# Altium PCB PCB2.PcbDoc
Units mm, origin at the board's own origin, x right, y up, seen from the top; angles counter-clockwise.
Board outline 150 x 150 mm, 2 copper layers (Top Layer, Bottom Layer); 52 components, 46 nets, 256 pads, 0 vias.
Unrouted connection lines stored in the file: 167.
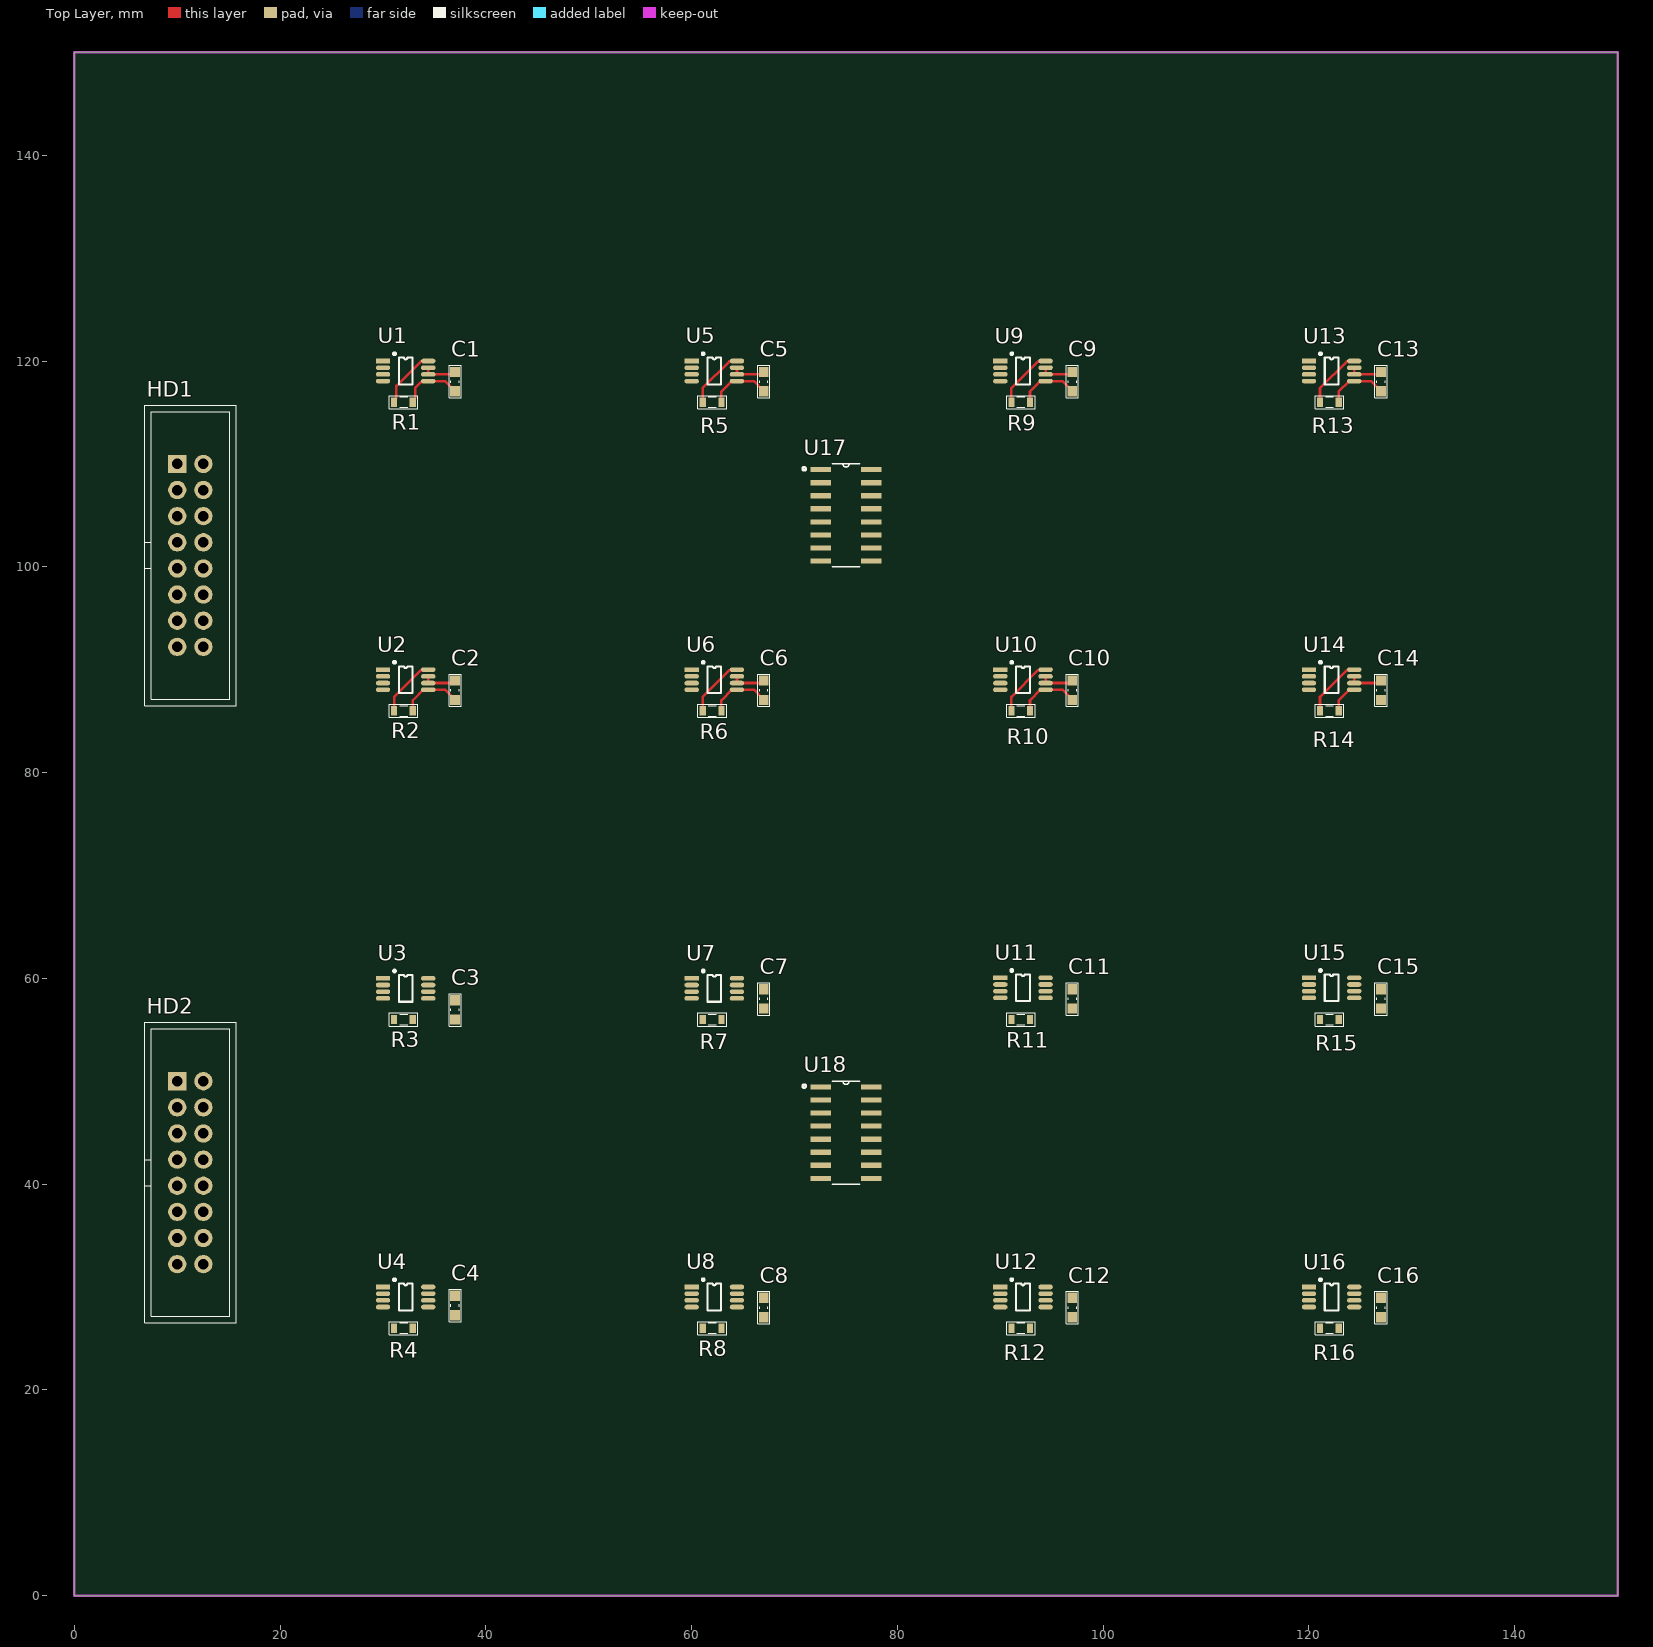
[diagram p0: Top Layer view]
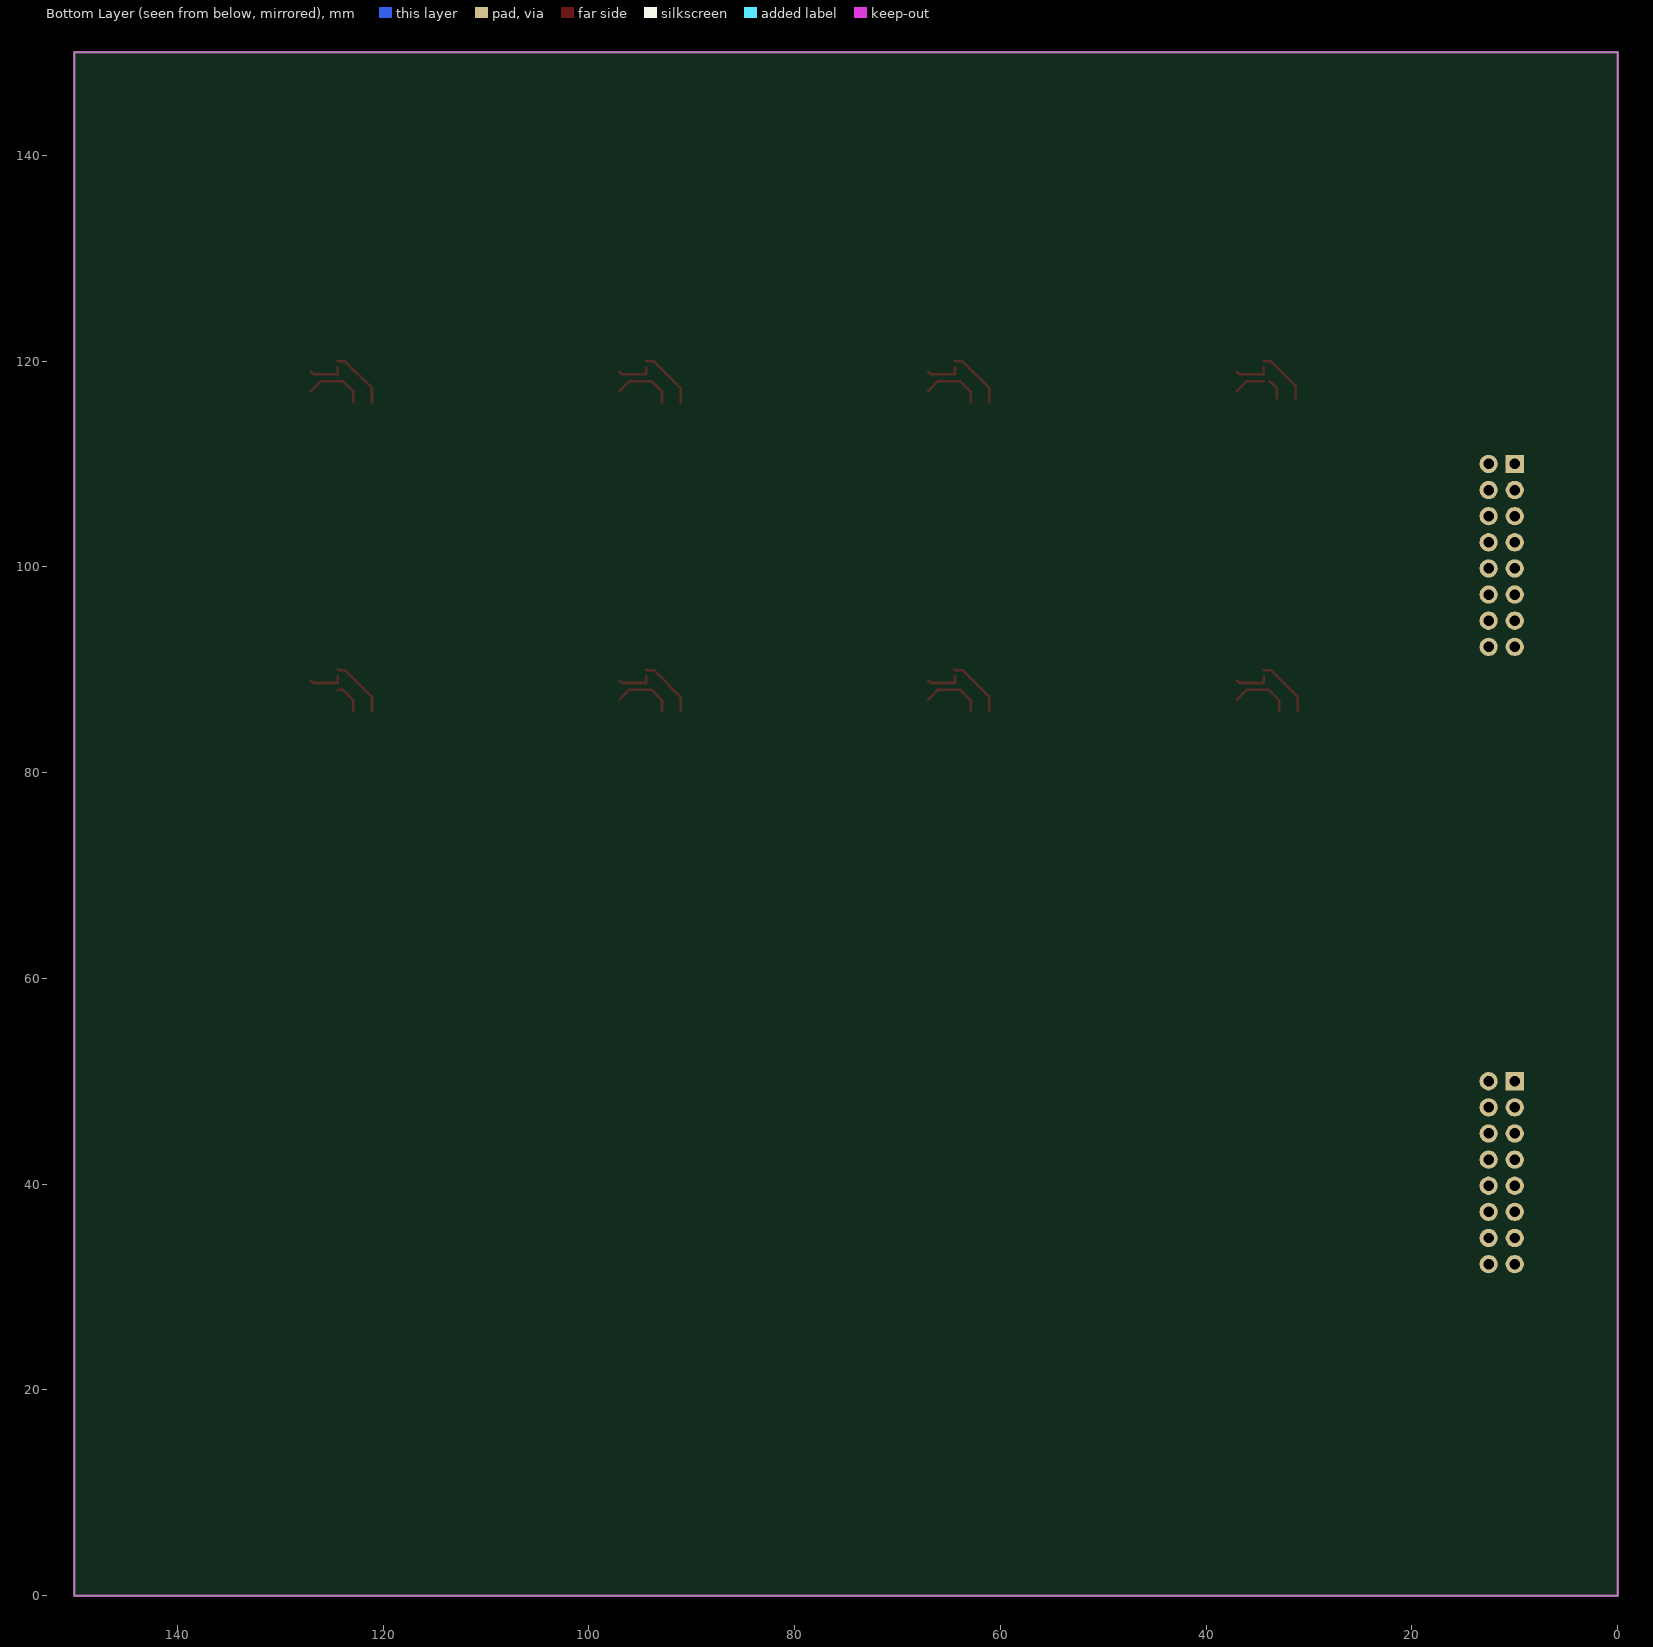
[diagram p1: Bottom Layer view, seen from below]

## Layer stack, top to bottom
Top Solder: solder mask 0.0102, Solder Resist, Dk 3.5
Top Layer: signal copper 0.0356
Dielectric 1: dielectric 0.32, FR-4, Dk 4.8
Bottom Layer: signal copper 0.0356
Bottom Solder: solder mask 0.0102, Solder Resist, Dk 3.5

## Board outline
0,0 0,150 150,150 150,0

## Design rules (kind name [scope] priority, off if disabled: settings)
Clearance [All] p1: gap=0.254 ignorepadtopadclearanceinfootprint=TRUE
PolygonConnect [All] p1: connectstyle=Relief reliefconductorwidth=0.254 reliefentries=4 polygonreliefangle="90 Angle" airgapwidth=0.254
RoutingVias [All] p1: holewidth=0.711 width=1.27 viastyle="Through Hole" minholewidth=0.711 minwidth=1.27 maxholewidth=0.711 maxwidth=1.27
SolderMaskExpansion [All] p1: expansion=0.102 istentingtop=FALSE
Width [All] p1: maxlimit=0.254 minlimit=0.254 preferedwidth=0.254
30 further rules are at their usual default settings.

## Classes and differential pairs
component class DECODER: HD1 HD2 U17 U18
component class SENSOR_ARRAY: C1 C2 C3 C4 C5 C6 C7 C8 C9 C10 C11 C12 C13 C14 C15 C16 R1 R2 R3 R4 R5 R6 R7 R8 R9 R10 R11 R12 R13 R14 R15 R16 U1 U2 U3 U4 U5 U6 U7 U8 U9 U10 U11 U12 U13 U14 U15 U16

## Components (designator, comment, footprint, x,y, rotation, side; value= is the part's Value field where it differs from the comment)
C1 "100nF" CAP_0603 37,118 r270 top value=33p
C2 "100nF" CAP_0603 37,88 r270 top value=33p
C3 "100nF" CAP_0603 37,56.935 r270 top value=33p
C4 "100nF" CAP_0603 37,28.2 r270 top value=33p
C5 "100nF" CAP_0603 67,118 r270 top value=33p
C6 "100nF" CAP_0603 67,88 r270 top value=33p
C7 "100nF" CAP_0603 67,58 r270 top value=33p
C8 "100nF" CAP_0603 67,28 r270 top value=33p
C9 "100nF" CAP_0603 97,118 r270 top value=33p
C10 "100nF" CAP_0603 97,88 r270 top value=33p
C11 "100nF" CAP_0603 97,58 r270 top value=33p
C12 "100nF" CAP_0603 97,28 r270 top value=33p
C13 "100nF" CAP_0603 127,118 r270 top value=33p
C14 "100nF" CAP_0603 127,88 r270 top value=33p
C15 "100nF" CAP_0603 127,58 r270 top value=33p
C16 "100nF" CAP_0603 127,28 r270 top value=33p
HD1 "IDC 8X2" IDC16 10,110 r270 top value="Header 5x2"
HD2 "IDC 8X2" IDC16 10,50 r270 top value="Header 5x2"
R1 "10k" RES-SMD-0603 32,116 r180 top
R2 "10k" RES-SMD-0603 32,86 r180 top
R3 "10k" RES-SMD-0603 32,56 r180 top
R4 "10k" RES-SMD-0603 32,26 r180 top
R5 "10k" RES-SMD-0603 62,116 r180 top
R6 "10k" RES-SMD-0603 62,86 r180 top
R7 "10k" RES-SMD-0603 62,56 r180 top
R8 "10k" RES-SMD-0603 62,26 r180 top
R9 "10k" RES-SMD-0603 92,116 r180 top
R10 "10k" RES-SMD-0603 92,86 r180 top
R11 "10k" RES-SMD-0603 92,56 r180 top
R12 "10k" RES-SMD-0603 92,26 r180 top
R13 "10k" RES-SMD-0603 122,116 r180 top
R14 "10k" RES-SMD-0603 122,86 r180 top
R15 "10k" RES-SMD-0603 122,56 r180 top
R16 "10k" RES-SMD-0603 122,26 r180 top
U1 "TMAG5170" SOP8 30,120 r0 top
U2 "TMAG5170" SOP8 30,90 r0 top
U3 "TMAG5170" SOP8 30,60 r0 top
U4 "TMAG5170" SOP8 30,30 r0 top
U5 "TMAG5170" SOP8 60,120 r0 top
U6 "TMAG5170" SOP8 60,90 r0 top
U7 "TMAG5170" SOP8 60,60 r0 top
U8 "TMAG5170" SOP8 60,30 r0 top
U9 "TMAG5170" SOP8 90,120 r0 top
U10 "TMAG5170" SOP8 90,90 r0 top
U11 "TMAG5170" SOP8 90,60.05 r0 top
U12 "TMAG5170" SOP8 90,30 r0 top
U13 "TMAG5170" SOP8 120,120 r0 top
U14 "TMAG5170" SOP8 120,90 r0 top
U15 "TMAG5170" SOP8 120,60.05 r0 top
U16 "TMAG5170" SOP8 120,30 r0 top
U17 "SN74LVC138AD" SOIC127P600X175-16N 75,105 r0 top
U18 "SN74LVC138AD" SOIC127P600X175-16N 75,45 r0 top

## Footprints (in the part's own frame and the unit in brackets; to place one, negate y for a bottom-side part, rotate by r counter-clockwise, add the part's x,y. Pads: shape width x height; smd on the part's side, far side on the other; paste and mask are expansions set on the pad)
CAP_0603 [mm]
  rect 1x0.95 smd mask+0.076: 1(-0.94,0) 2(0.94,0)
  silkscreen extent -1.57,-0.58 1.57,0.58, body extent -0.77,-0.39 0.83,0.41, height 0.9
IDC16 [mil]
  rect 70x70 hole 40: 1(0,0)
  round 70 hole 40: 2(0,100) 3(100,0) 4(100,100) 5(200,0) 6(200,100) 7(300,0) 8(300,100) 9(400,0) 10(400,100) 11(500,0) 12(500,100) 13(600,0) 14(600,100) 15(700,0) 16(700,100)
  silkscreen extent -225,-125 925,225, body extent -225,-125 926,225, height 358
RES-SMD-0603 [mm]
  rect 0.6x0.9 smd: 1(-0.889,0) 2(0.927,0)
  silkscreen extent -1.4,-0.64 1.4,0.64, body extent -0.8,-0.4 0.8,0.4, height 0.43
SOIC127P600X175-16N [mil]
  rect 78x20 smd: 1(-97,175) 2(-97,125) 3(-97,75) 4(-97,25) 5(-97,-25) 6(-97,-75) 7(-97,-125) 8(-97,-175) 9(97,-175) 10(97,-125) 11(97,-75) 12(97,-25) 13(97,25) 14(97,75) 15(97,125) 16(97,175)
  silkscreen extent -166,-197 52,197, body extent -118,-195 118,195, height 69
SOP8 [mm]
  oval 1.4x0.45 smd: ALERT(4.4,0) CS(0,-1.95) GND(4.4,-1.3) SDI(0,-0.65) SDO(0,-1.3) TEST(4.4,-0.65) VCC(4.4,-1.95)
  rect 1.4x0.45 smd: SCK(0,0)
  silkscreen extent 1.01,-2.28 2.87,0.82

## Part data
C1 C2 C3 C4 C5 C6 C7 C8 C9 C10 C11 C12 C13 C14 C15 C16: library part CapSMD, "Capacitor", LatestRevisionDate=17-Jul-2002, LatestRevisionNote="Re-released for DXP Platform.", PackageReference=RAD-0.3, Published=8-Jun-2000, Publisher="Altium Limited"
HD1 HD2: library part "IDC 8x2"
R1 R2 R3 R4 R5 R6 R7 R8 R9 R10 R11 R12 R13 R14 R15 R16: library part "Resistor - SMD", "Resistor SMD", Manufacturer="Generic Components", Class=Passive, Published=08/06/2000, Publisher="Altium Hobart Technology Centre"
U17 U18: "3-Line To 8-Line decoder/Demultiplexer", Package="SOIC-16 Texas Instruments", Check_prices=https://www.snapeda.com/parts/SN74LVC138AD/Texas+Instruments/view-part/?ref=eda, MF="Texas Instruments", MP=SN74LVC138AD, SnapEDA_Link=https://www.snapeda.com/parts/SN74LVC138AD/Texas+Instruments/view-part/?ref=snap

## Nets (pads, with @x,y where several pads share a name; then routed paths per layer and width w, separated by ;. In a path a pad name is that pad's centre, name@x,y a point inside that pad or via, vN(x,y) a via of type N, cw(c..) or ccw(c..) an arc to the next point about the centre after c; other vN are vias at no path point)
3V3: C1.2 C2.2 C3.2 C4.2 C5.2 C6.2 C7.2 C8.2 C9.2 C10.2 C11.2 C12.2 C13.2 C14.2 C15.2 C16.2 HD1.1 HD1.2 HD2.1 HD2.2 R1.1 R2.1 R3.1 R4.1 R5.1 R6.1 R7.1 R8.1 R9.1 R10.1 R11.1 R12.1 R13.1 R14.1 R15.1 R16.1 U1.VCC U2.VCC U3.VCC U4.VCC U5.VCC U6.VCC U7.VCC U8.VCC U9.VCC U10.VCC U11.VCC U12.VCC U13.VCC U14.VCC U15.VCC U16.VCC U17.6 U17.16 U18.6 U18.16 | length 43.9
  Top Layer w0.254: R2.1 32.889,87.014 33.925,88.05 U2.VCC 36.035,88.05 37,87.085 C2.2 ; R1.1@33.114,116.4 33.114,117.364 33.702,117.952 33.774,117.952 U1.VCC@33.872,118.05 ; U1.VCC 36.035,118.05 37,117.085 C1.2 ; R6.1 62.889,87.014 63.925,88.05 U6.VCC 66.035,88.05 67,87.085 C6.2 ; R5.1 62.889,117.014 63.925,118.05 U5.VCC 66.035,118.05 67,117.085 C5.2 ; R10.1 92.889,87.014 93.925,88.05 U10.VCC 96.035,88.05 97,87.085 C10.2 ; R9.1 92.889,117.014 93.925,118.05 U9.VCC 96.035,118.05 97,117.085 C9.2 ; R14.1 122.889,87.014 123.925,88.05 U14.VCC ; R13.1 122.889,117.014 123.925,118.05 U13.VCC 126.035,118.05 127,117.085 C13.2
A1: HD1.4 U17.1
A2: HD2.4 U18.1
B1: HD1.8 U17.2
B2: HD2.8 U18.2
C1: HD1.12 U17.3
C2: HD2.12 U18.3
GND: C1.1 C2.1 C3.1 C4.1 C5.1 C6.1 C7.1 C8.1 C9.1 C10.1 C11.1 C12.1 C13.1 C14.1 C15.1 C16.1 HD1.5 HD1.6 HD1.9 HD1.10 HD1.13 HD1.14 HD2.5 HD2.6 HD2.9 HD2.10 HD2.13 HD2.14 U1.GND U1.TEST U2.GND U2.TEST U3.GND U3.TEST U4.GND U4.TEST U5.GND U5.TEST U6.GND U6.TEST U7.GND U7.TEST U8.GND U8.TEST U9.GND U9.TEST U10.GND U10.TEST U11.GND U11.TEST U12.GND U12.TEST U13.GND U13.TEST U14.GND U14.TEST U15.GND U15.TEST U16.GND U16.TEST U17.4 U17.5 U17.8 U18.4 U18.5 U18.8 | length 26.8
  Top Layer w0.254: U2.TEST U2.GND 36.76,88.7 C2.1 ; U1.TEST U1.GND 36.76,118.7 C1.1 ; U6.TEST U6.GND 66.76,88.7 C6.1 ; U5.TEST U5.GND 66.76,118.7 C5.1 ; U10.TEST U10.GND 96.76,88.7 C10.1 ; U9.TEST U9.GND 96.76,118.7 C9.1 ; U14.TEST U14.GND 126.76,88.7 C14.1 ; U13.TEST U13.GND 126.76,118.7 C13.1
NetR1_2: R1.2 U1.ALERT | length 5.3
  Top Layer w0.254: R1.2@31.298,116.4 31.298,117.58 33.68,119.962 34.362,119.962 U1.ALERT
NetR2_2: R2.2 U2.ALERT | length 5.8
  Top Layer w0.254: R2.2 31.073,87.355 33.68,89.962 34.362,89.962 U2.ALERT
NetR3_2: R3.2 U3.ALERT
NetR4_2: R4.2 U4.ALERT
NetR5_2: R5.2 U5.ALERT | length 5.8
  Top Layer w0.254: R5.2 61.073,117.355 63.68,119.962 64.362,119.962 U5.ALERT
NetR6_2: R6.2 U6.ALERT | length 5.8
  Top Layer w0.254: R6.2 61.073,87.355 63.68,89.962 64.362,89.962 U6.ALERT
NetR7_2: R7.2 U7.ALERT
NetR8_2: R8.2 U8.ALERT
NetR9_2: R9.2 U9.ALERT | length 5.8
  Top Layer w0.254: R9.2 91.073,117.355 93.68,119.962 94.362,119.962 U9.ALERT
NetR10_2: R10.2 U10.ALERT | length 5.8
  Top Layer w0.254: R10.2 91.073,87.355 93.68,89.962 94.362,89.962 U10.ALERT
NetR11_2: R11.2 U11.ALERT
NetR12_2: R12.2 U12.ALERT
NetR13_2: R13.2 U13.ALERT | length 5.8
  Top Layer w0.254: R13.2 121.073,117.355 123.68,119.962 124.362,119.962 U13.ALERT
NetR14_2: R14.2 U14.ALERT | length 5.8
  Top Layer w0.254: R14.2 121.073,87.355 123.68,89.962 124.362,89.962 U14.ALERT
NetR15_2: R15.2 U15.ALERT
NetR16_2: R16.2 U16.ALERT
SENS1: U1.CS U17.15
SENS2: U2.CS U17.14
SENS3: U3.CS U17.13
SENS4: U4.CS U17.12
SENS5: U5.CS U17.11
SENS6: U6.CS U17.10
SENS7: U7.CS U17.9
SENS8: U8.CS U17.7
SENS9: U9.CS U18.15
SENS10: U10.CS U18.14
SENS11: U11.CS U18.13
SENS12: U12.CS U18.12
SENS13: U13.CS U18.11
SENS14: U14.CS U18.10
SENS15: U15.CS U18.9
SENS16: U16.CS U18.7
SPI1_MISO: HD1.7 U1.SDO U2.SDO U3.SDO U4.SDO U5.SDO U6.SDO U7.SDO U8.SDO
SPI1_MOSI: HD1.3 U1.SDI U2.SDI U3.SDI U4.SDI U5.SDI U6.SDI U7.SDI U8.SDI
SPI1_SCK: HD1.11 U1.SCK U2.SCK U3.SCK U4.SCK U5.SCK U6.SCK U7.SCK U8.SCK
SPI2_MISO: HD2.7 U9.SDO U10.SDO U11.SDO U12.SDO U13.SDO U14.SDO U15.SDO U16.SDO
SPI2_MOSI: HD2.3 U9.SDI U10.SDI U11.SDI U12.SDI U13.SDI U14.SDI U15.SDI U16.SDI
SPI2_SCK: HD2.11 U9.SCK U10.SCK U11.SCK U12.SCK U13.SCK U14.SCK U15.SCK U16.SCK
pads on no net: HD1.15 HD1.16 HD2.15 HD2.16

## Keep-outs
Keep-Out Layer:
  the board outline again, w0.254